# Altium PCB 1SL1 Xilinx Spartan-11E PQ208.PcbDoc (part 2 of 5)
Units mil, origin at the board's own origin, x right, y up, seen from the top; angles counter-clockwise.
Board outline 7086.61 x 1988.19 mil, 2 copper layers (Top Layer, Bottom Layer), stack 29.698 mil thick; 115 components, 126 nets, 642 pads, 225 vias.
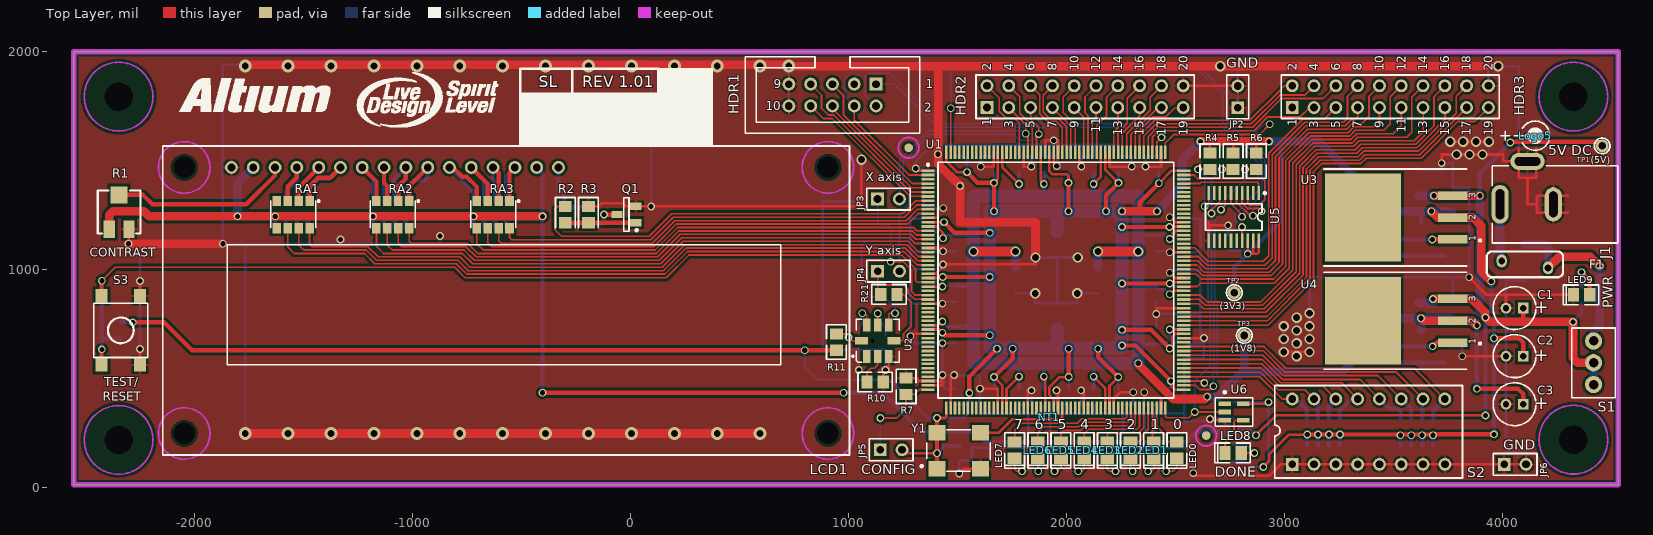
[diagram p0: Top Layer view]

## Via types
v1: diameter 35.43, hole 23.62, Top Layer to Bottom Layer, tented both sides, 168 vias
v2: diameter 59.06, hole 31.5, Top Layer to Bottom Layer, tented both sides, 27 vias
v3: diameter 47.24, hole 31.5, Top Layer to Bottom Layer, 18 vias
v4: diameter 47.24, hole 31.5, Top Layer to Bottom Layer, tented both sides, 11 vias
v5: diameter 35.43, hole 23.62, Top Layer to Bottom Layer, 1 vias

## Nets (pads, with @x,y where several pads share a name; then routed paths per layer and width w, separated by ;. In a path a pad name is that pad's centre, name@x,y a point inside that pad or via, vN(x,y) a via of type N, cw(c..) or ccw(c..) an arc to the next point about the centre after c; other vN are vias at no path point) (continued)
LCD_DB1: (continued)
  Top Layer w7.87: RA2.6@-1115.5,1188.03 -1115.5,1109.68 -1093.45,1087.63 -763.72,1087.63 -716.48,1040.39 131.71,1040.39 235.06,1143.73 1279.22,1143.73 1305.79,1117.16 U1.18@1364.23,1117.16
LCD_DB2: RA2.7 U1.17 | length 2577.1
  Top Layer w7.87: RA2.7@-1065.5,1188.03 -1065.5,1118.73 -1050.14,1103.38 -755.85,1103.38 -708.61,1056.13 125.19,1056.13 228.54,1159.48 1285.74,1159.48 1308.38,1136.84 U1.17@1364.23,1136.84
LCD_DB3: RA2.8 U1.16 | length 2513.7
  Top Layer w7.87: RA2.8@-1015.5,1188.03 -1015.5,1127.79 -1006.83,1119.13 -747.98,1119.13 -700.73,1071.88 118.67,1071.88 222.01,1175.23 1292.26,1175.23 1310.96,1156.53 U1.16@1364.23,1156.53